# Altium PCB Copy of PCB.PcbDoc (part 2 of 5)
Units mm, origin at the board's own origin, x right, y up, seen from the top; angles counter-clockwise.
Board outline 130 x 115.04 mm, 6 copper layers (Top Layer, Int1 (GND), Int2, Int3 (PWR), Int4 (GND), Bottom Layer), stack 1.647 mm thick; 306 components, 246 nets, 1107 pads, 360 vias.
Unrouted connection lines stored in the file: 123.
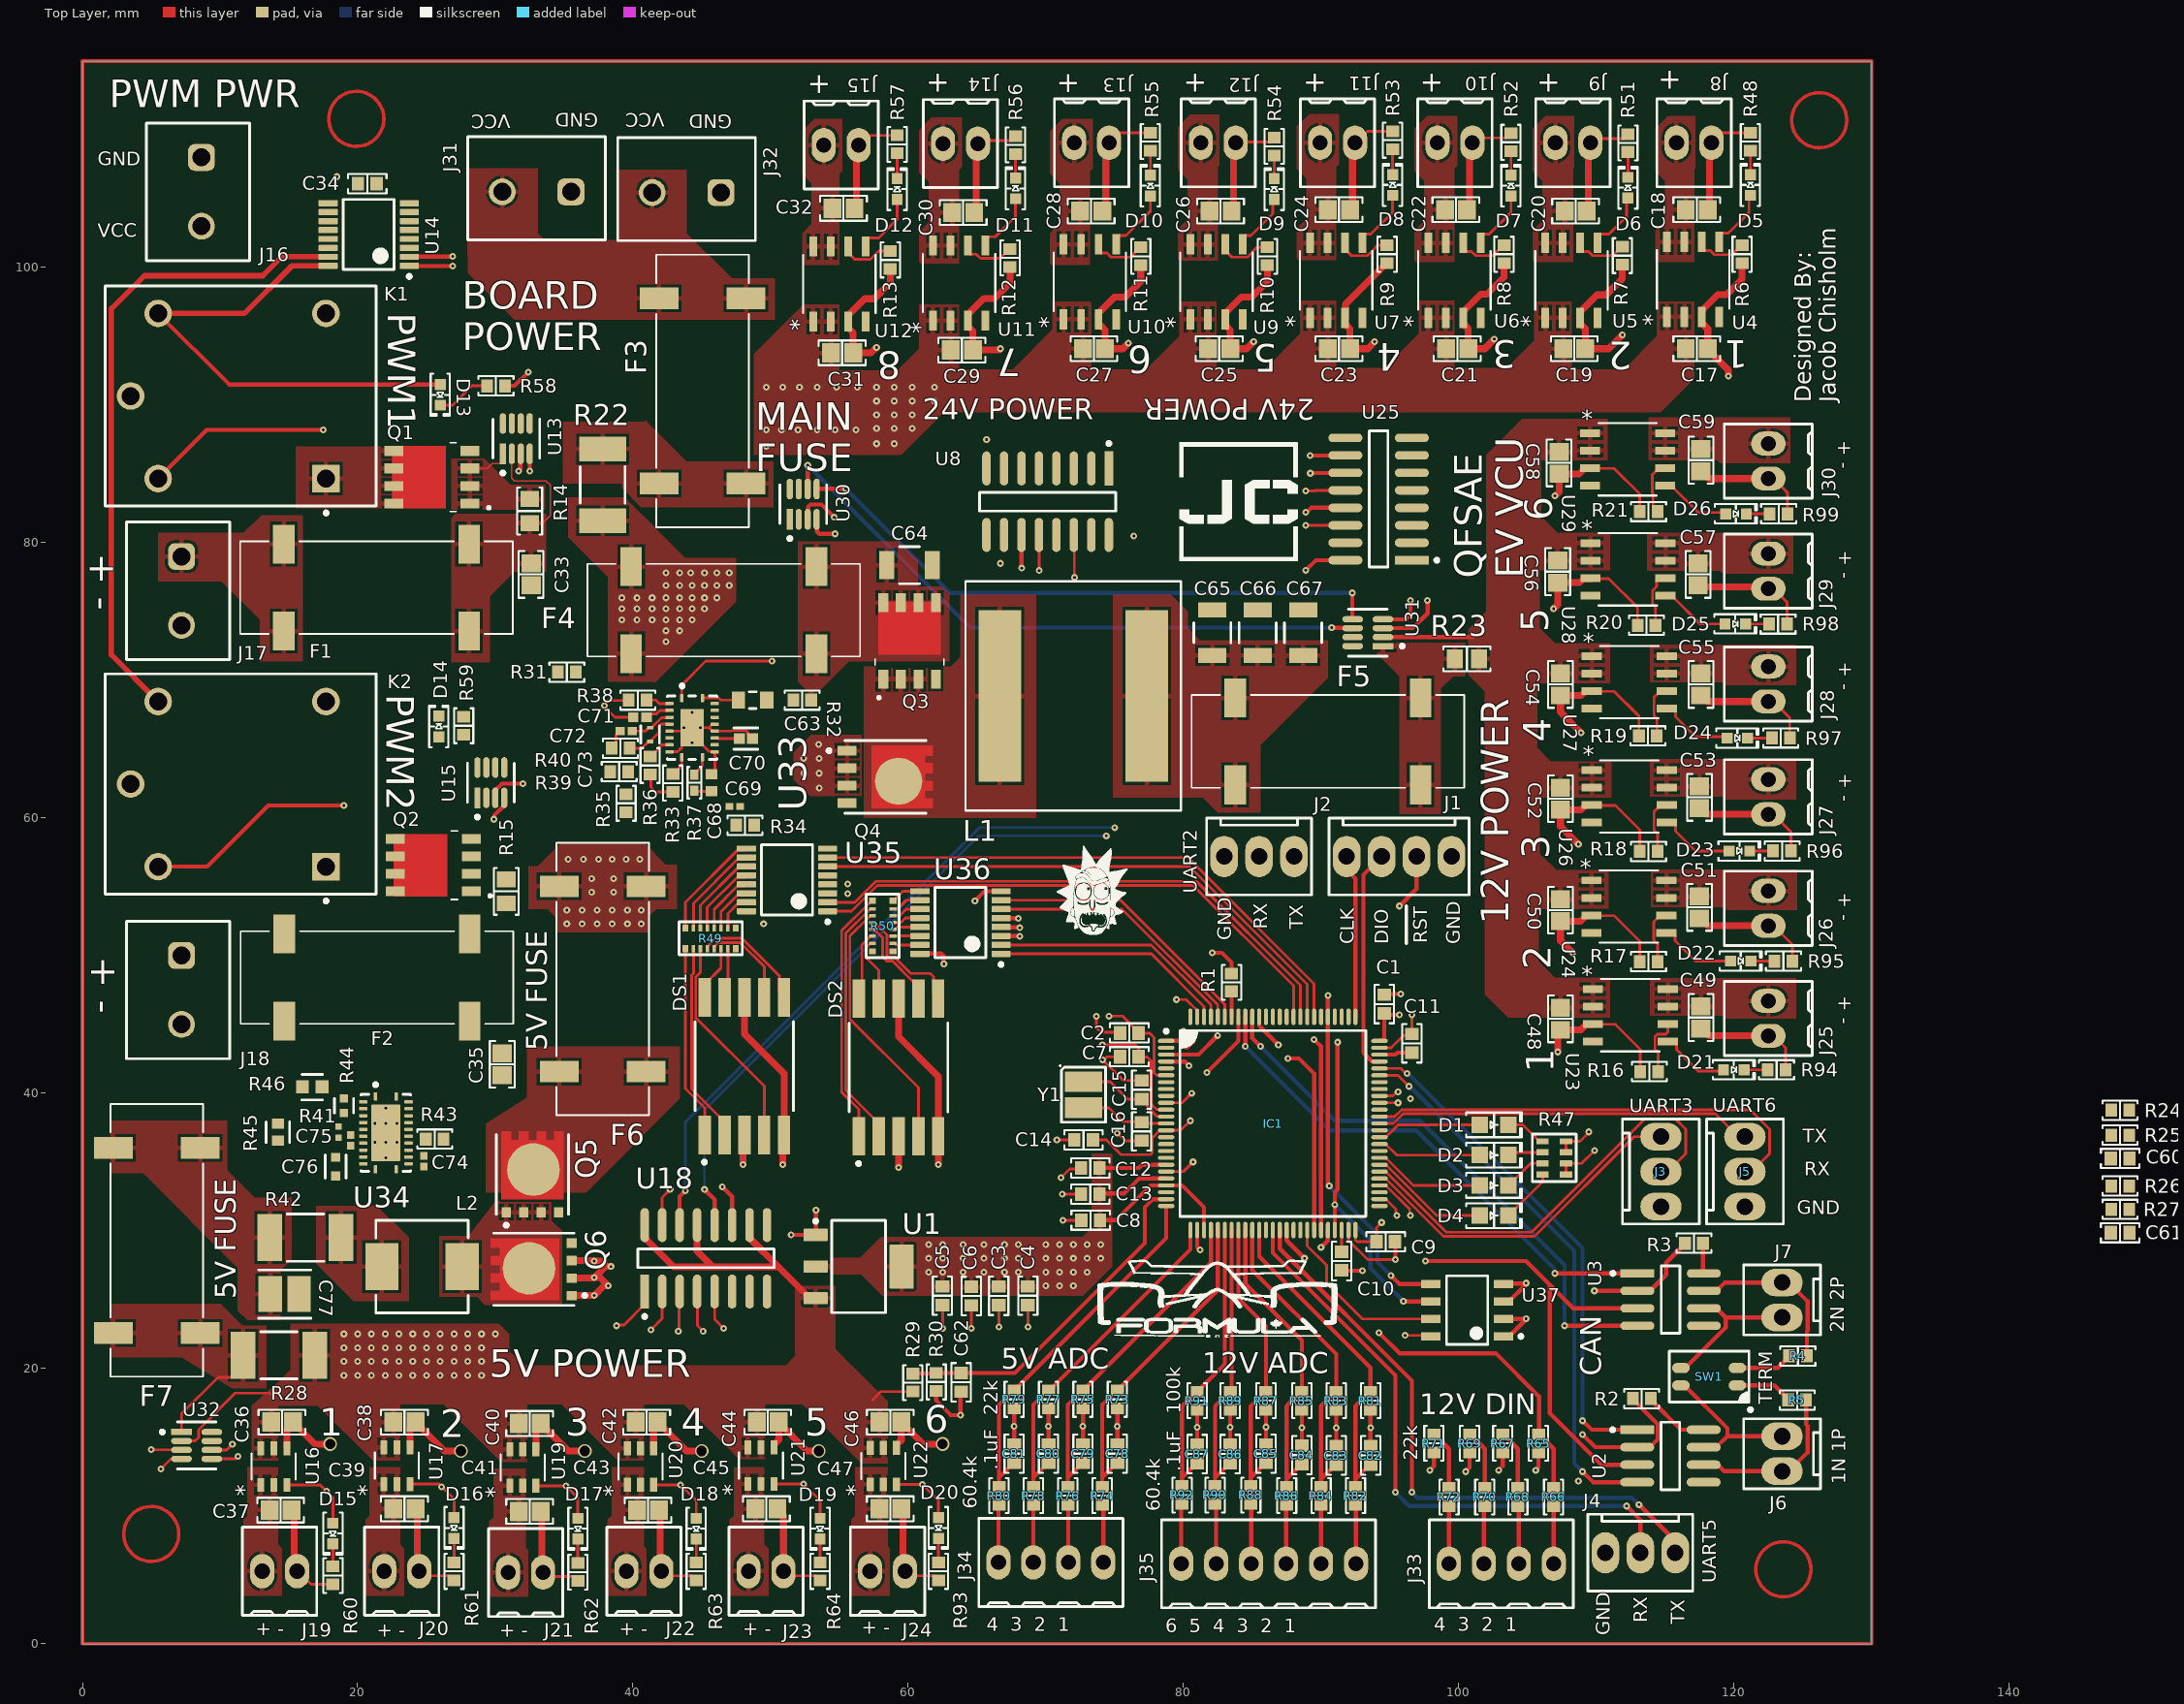
[diagram p0: Top Layer view]

## Part data (continued)
C77: library part CMP-2000-06362-2, "CAP CER 47UF 16V X5R 1210", Capacitance=47uF, Case Code (Imperial)=1210, Case Code (Metric)=3225, Dielectric=X5R, Max Operating Temperature=85°C, Min Operating Temperature=-55°C, Package Quantity=1, Tolerance=10%, Voltage=16V, Case/Package=1210, Depth=2.5mm, Height=2.5mm, Lead Free="Lead Free", Length=3.2mm, Material=Ceramic, Mount="Surface Mount", Number of Pins=2, packaging="Cut Tape", Radiation Hardening=No, REACH SVHC="No SVHC", RoHS Compliant=Yes, Termination=SMD/SMT, Thickness=0.106inch, Voltage Rating=16V, Voltage Rating (DC)=16V, Width=0.098inch
D1: library part SM0805URC, "LED RED CLEAR 0805 SMD", Current - Test=20mA, Device Package="0805 (2012 Metric)", Lens Color=Colorless, manufacturer="Bivar Inc.", Millicandela Rating=55mcd, Supplier Device Package=0805, Supplier Part Number 1=492-1350-1-ND, Voltage - Forward (Vf) (Typ)=2.1V, Color=Red, componentlink1description=Datasheet, componentlink1url=https://www.bivar.com/Files/Datasheets/SM0805URC.pdf, componentlink2description="DigiKey Link", componentlink2url=https://www.digikey.com/en/products/detail/bivar-inc/SM0805URC/528906, Configuration=Standard, Height (Max)=1.10mm, lastupdated="1/17/2024 9:33:19 PM", Lens Size="1.40mm x 1.20mm", Lens Style="Rectangle with Flat Top", Lens Transparency=Clear, Lifecycle Status=Active, Minimum Order=1, Mounting Type="Surface Mount", Package / Case="0805 (2012 Metric)", packaging=TapeAndReel, Part Number=SM0805URC, Part Status=Active, partid=317, price=0.17, series=-, Size / Dimension="2.00mm L x 1.20mm W", Supplier 1=DigiKey, Viewing Angle=130°, Wavelength - Dominant=640nm, Wavelength - Peak=655nm